# Altium PCB PCBv2.PcbDoc (part 1 of 2)
Units mil, origin at the board's own origin, x right, y up, seen from the top; angles counter-clockwise.
Board outline 6515 x 2205 mil, 4 copper layers (Top Layer, GND, Power, Bottom Layer), stack 30.8 mil thick; 165 components, 130 nets, 555 pads, 55 vias.
Unrouted connection lines stored in the file: 261.
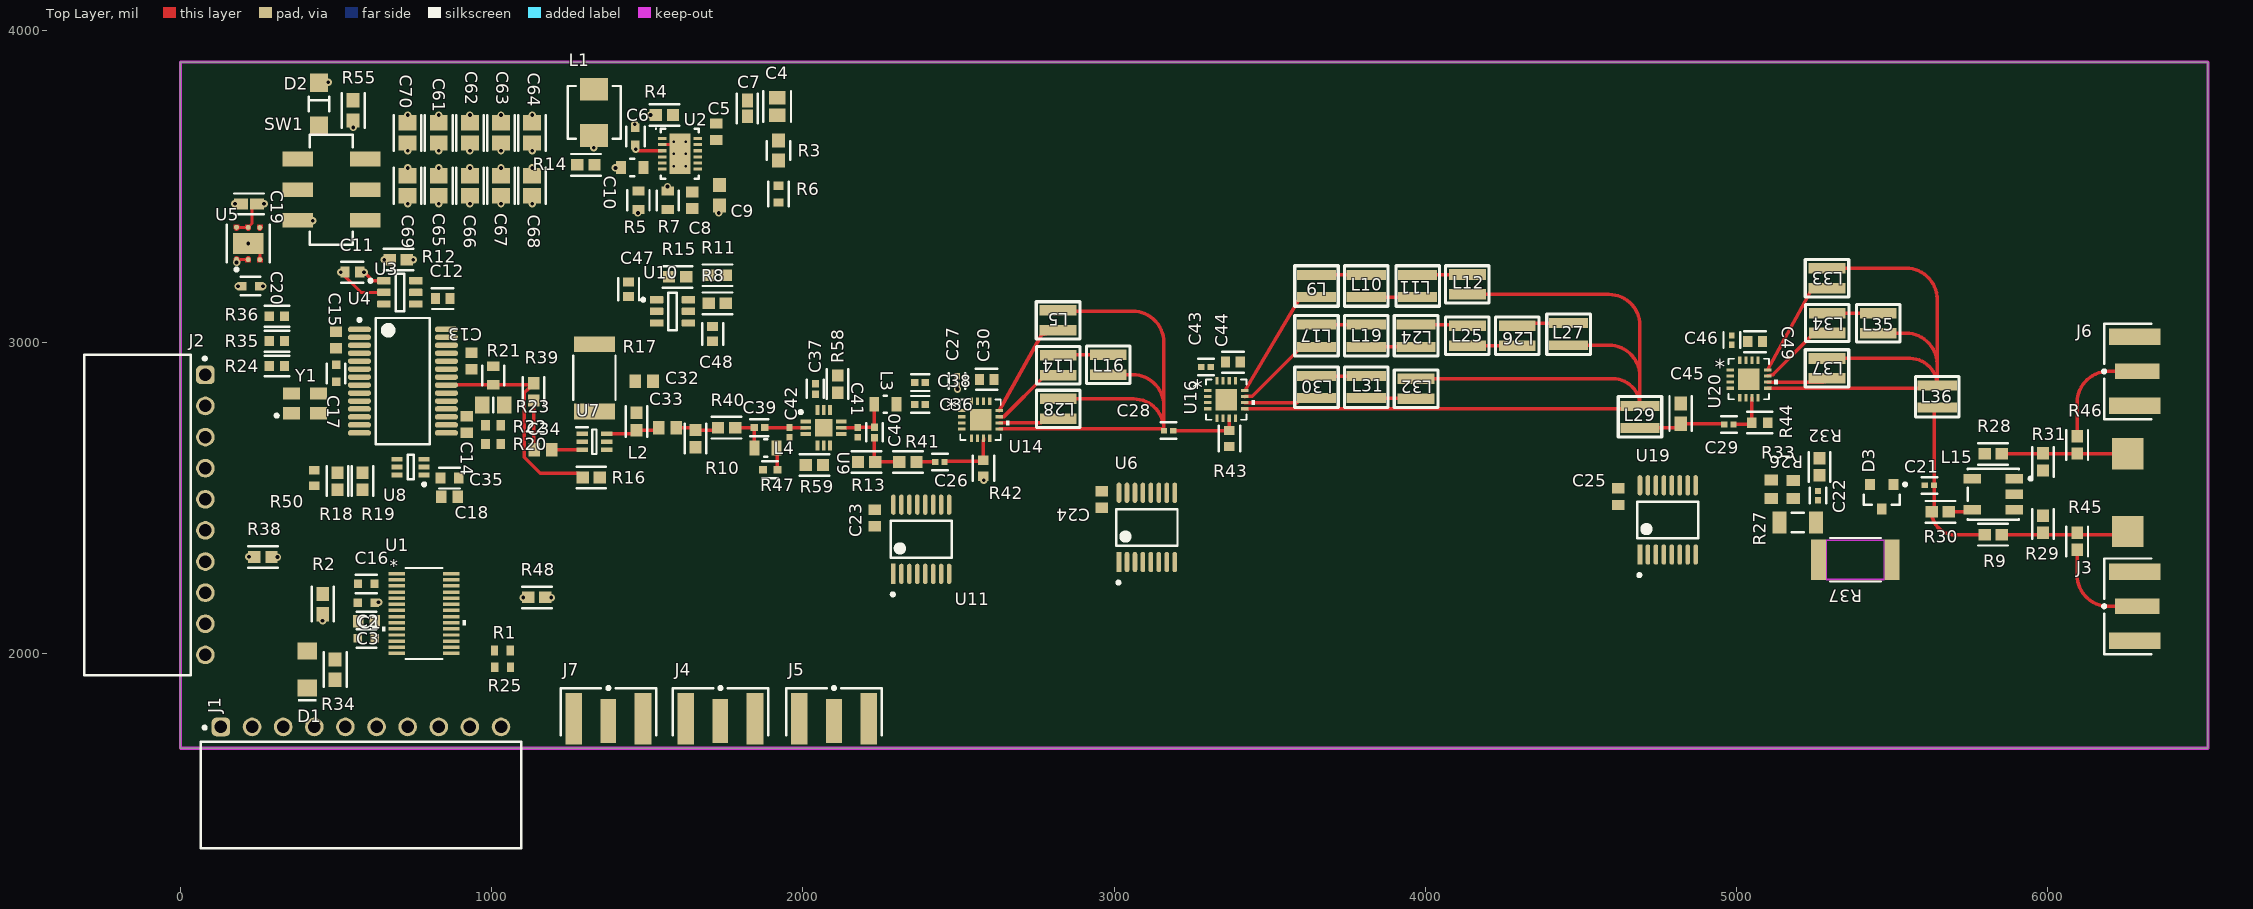
[diagram p0: Top Layer view]
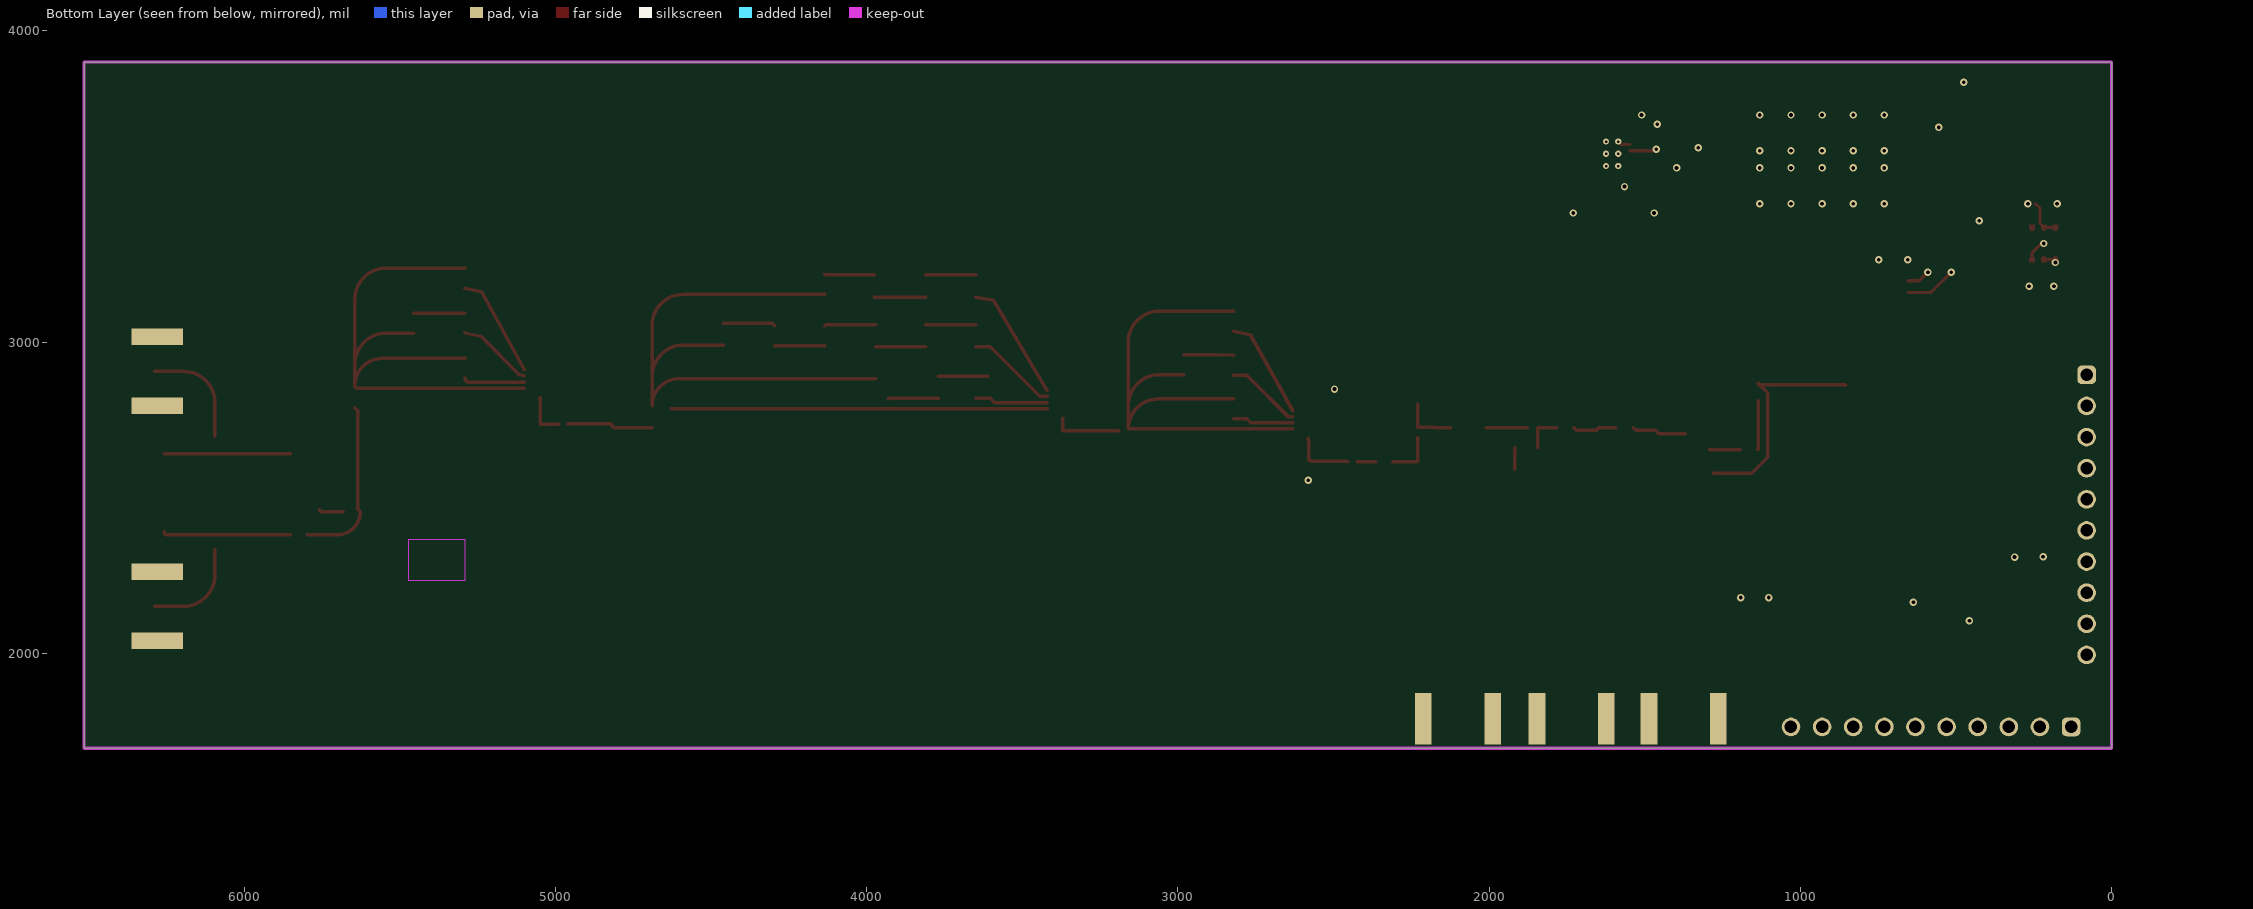
[diagram p1: Bottom Layer view, seen from below]
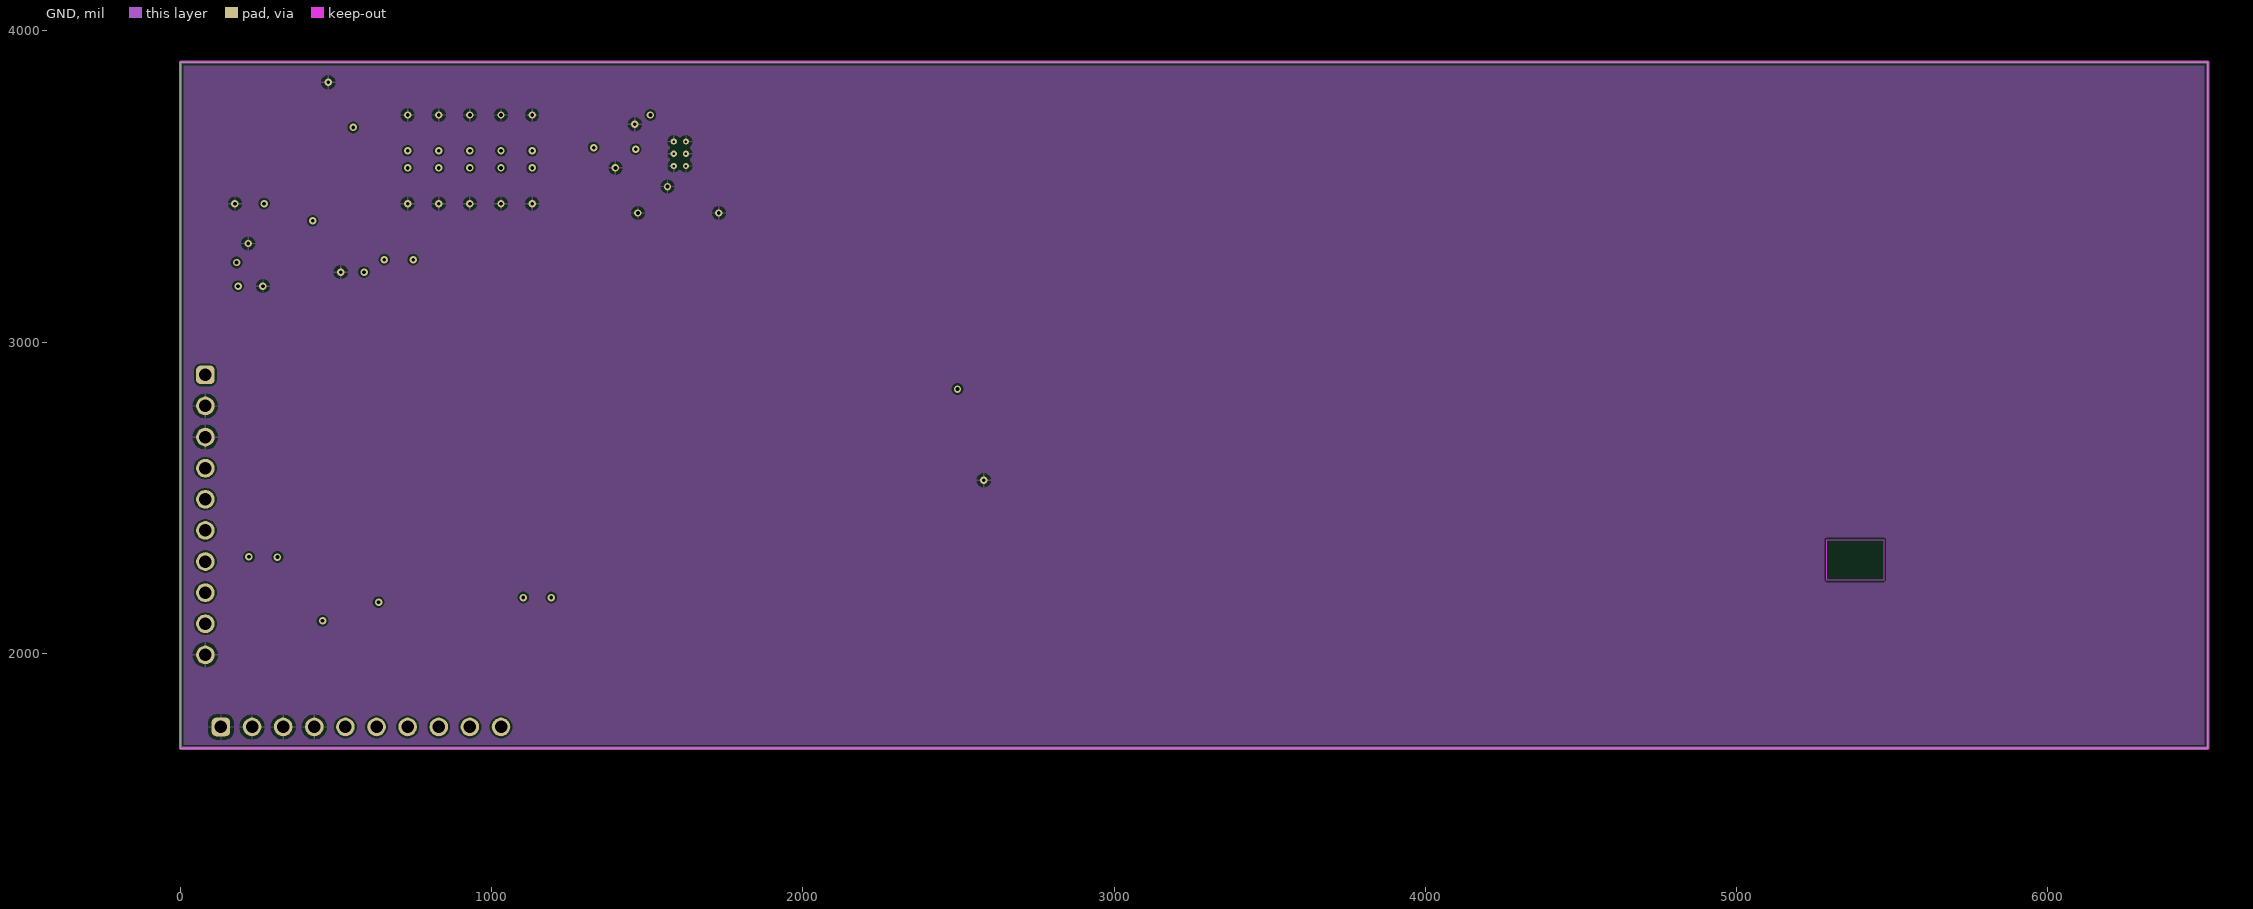
[diagram p2: GND]
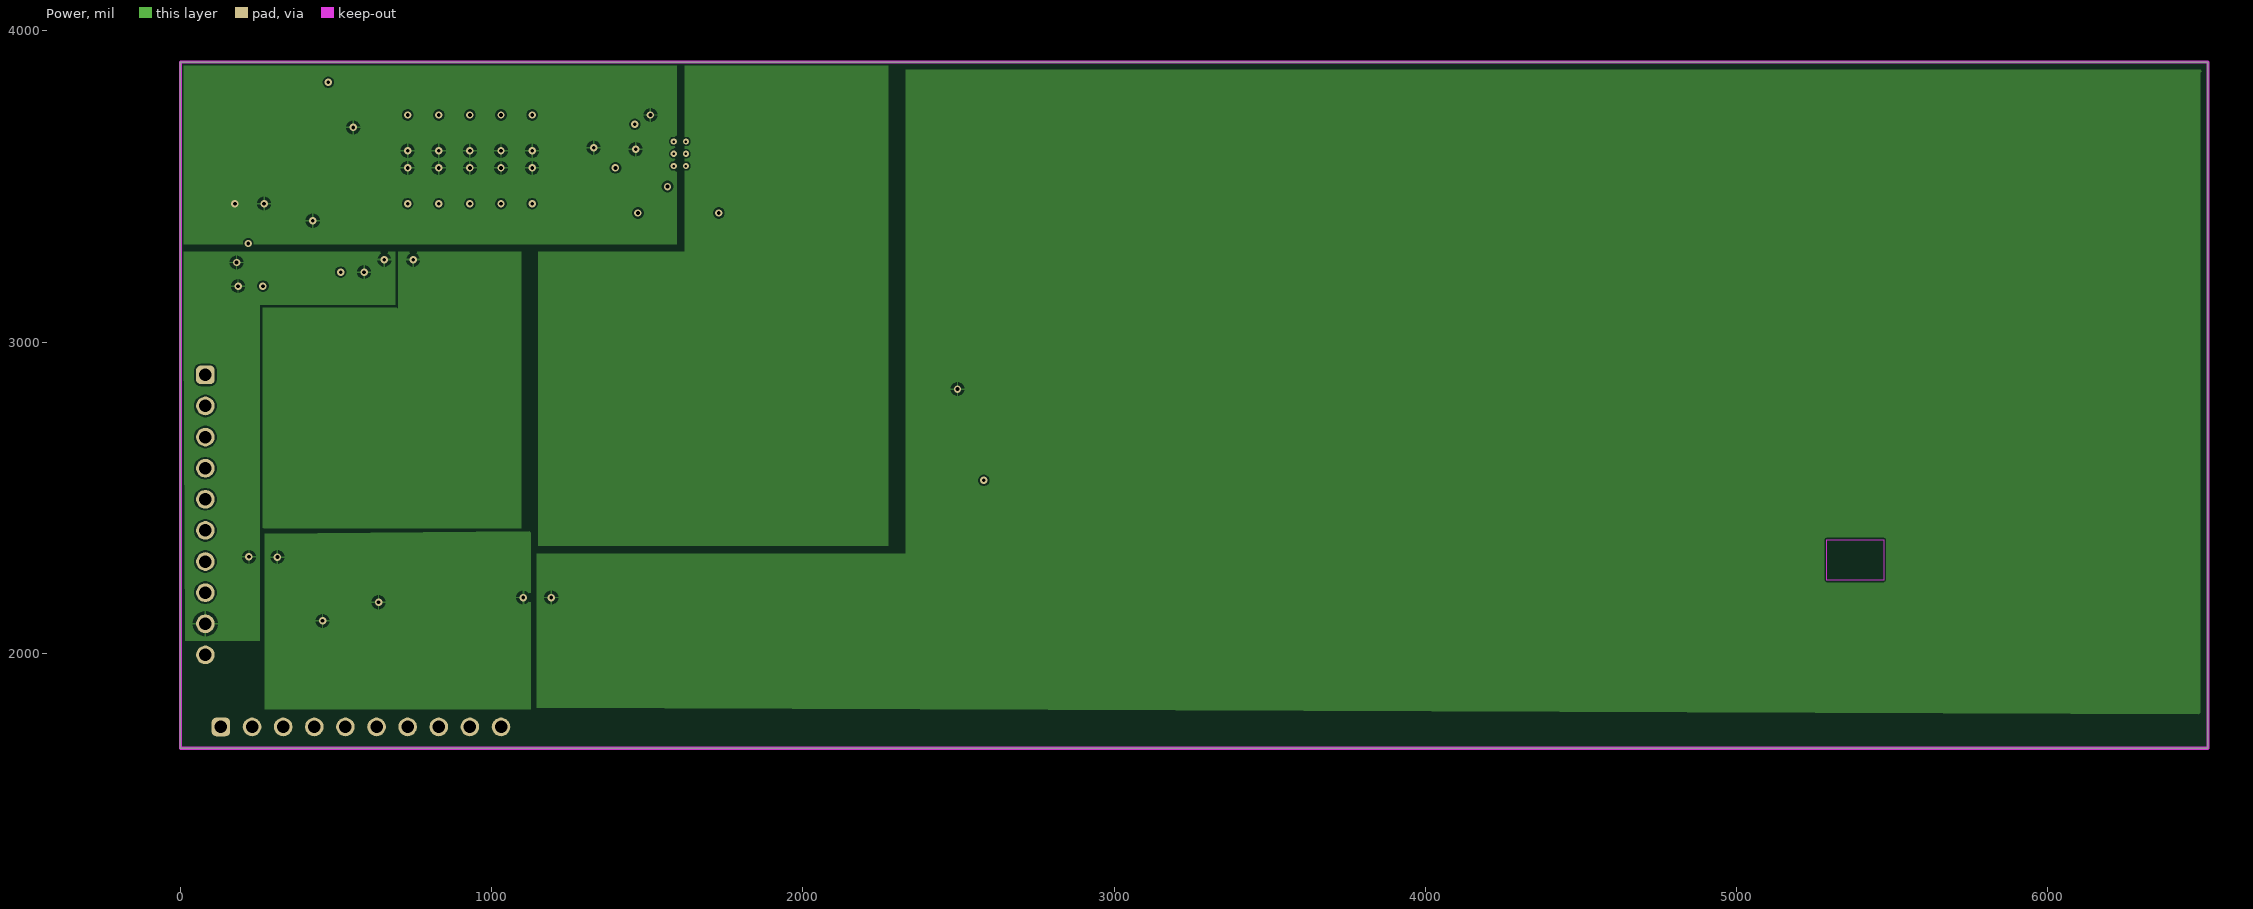
[diagram p3: Power]

## Layer stack, top to bottom
Top Solder: solder mask 0.4, Solder Resist, Dk 3.5
Top Layer: signal copper 1.4
Dielectric 2: prepreg 6.3, PP-006, Dk 4.1
GND: signal copper 1.4
Dielectric 1: dielectric 12.6, FR-4, Dk 4.8
Power: signal copper 1.4
Dielectric 3: prepreg 6.3, PP-006, Dk 4.1
Bottom Layer: signal copper 1.4
Bottom Solder: solder mask 0.4, Solder Resist, Dk 3.5

## Board outline
0,1695 0,3900 6515,3900 6515,1695

## Design rules (kind name [scope] priority, off if disabled: settings)
Clearance [All] p1: gap=6 ignorepadtopadclearanceinfootprint=FALSE except(8: Via-Via; 10: Text-Text)
HoleSize [All] p1: absolutevalues=TRUE maxlimit=100 minlimit=12 maxpercent=80.000 minpercent=20.000
MinimumAnnularRing [All] p1: minimumring=6
MinimumSolderMaskSliver [All] p1 off: minsoldermaskwidth=10
PolygonConnect [All] p1: connectstyle=Relief reliefconductorwidth=6 reliefentries=4 polygonreliefangle="90 Angle" airgapwidth=10
RoomDefinition "U_Match Network" [InComponentClass('U_Match Network')] p1: confinementstyle=ConfineIn formatcopy=TRUE lockcomponents=FALSE outline 1960.43,2110 6090.43,2110 6090.43,3421.1 1960.43,3421.1
RoomDefinition U_Rectifier [InComponentClass('U_Rectifier')] p2: confinementstyle=ConfineIn formatcopy=TRUE lockcomponents=FALSE outline 4945,2800.5 4945,1955 5805,1955 5805,2800.5
RoomDefinition U_Output [InComponentClass('Room Definition1')] p3: confinementstyle=ConfineIn formatcopy=TRUE lockcomponents=FALSE outline 5585.08,1981.22 6760.08,1981.22 6760.08,3085 5585.08,3085
RoomDefinition "U_PA stage 1" [InComponentClass('U_PA stage 1')] p4: confinementstyle=ConfineIn formatcopy=TRUE lockcomponents=FALSE outline 1095,2585 1650,2585 1650,3040 1095,3040
RoomDefinition "U_PA stage 2" [InComponentClass('U_PA stage 2')] p5: confinementstyle=ConfineIn formatcopy=TRUE lockcomponents=FALSE outline 1790,2450 2420,2450 2420,2960 1790,2960
RoomDefinition U_MCU [InComponentClass('U_MCU')] p6: confinementstyle=ConfineIn formatcopy=TRUE lockcomponents=FALSE outline 347.25,1842.98 1142.25,1842.98 1142.25,2337.98 347.25,2337.98
RoomDefinition VBAT [InComponentClass('Room Definition2')] p7: confinementstyle=ConfineIn formatcopy=TRUE lockcomponents=FALSE outline 305,3290 1190,3290 1190,3885 305,3885
RoomDefinition "U_Switch 1" [InComponentClass('U_Switch1')] p8: confinementstyle=ConfineIn formatcopy=TRUE lockcomponents=FALSE outline 890,3355 480,3355 480,3015 890,3015
RoomDefinition U_LDO [InComponentClass('U_LDO')] p9: confinementstyle=ConfineIn formatcopy=TRUE lockcomponents=FALSE outline 130.2,3546.07 130.2,3134.05 375.2,3134.05 375.2,3546.07
RoomDefinition "U_Boost 12V" [InComponentClass('U_Boost 12V')] p10: confinementstyle=ConfineIn formatcopy=TRUE lockcomponents=FALSE outline 1172.6,3245 2002.6,3245 2002.6,3980 1172.6,3980
RoomDefinition "U_Switch 2" [InComponentClass('U_Switch2')] p11: confinementstyle=ConfineIn formatcopy=TRUE lockcomponents=FALSE outline 1325,2955 1810,2955 1810,3290 1325,3290
RoomDefinition U_DDS [InComponentClass('U_DDS')] p12: confinementstyle=ConfineIn formatcopy=TRUE lockcomponents=FALSE outline 75,2340 1085,2340 1085,3205 75,3205
RoutingVias [All] p1: holewidth=12 width=24 viastyle="Through Hole" minholewidth=12 minwidth=24 maxholewidth=28 maxwidth=100
SilkToSilkClearance [All] p1 off: silktosilkclearance=10
SilkToSolderMaskClearance [IsPad] p1 off: minsilkscreentomaskgap=10 clearancetoexposedcopper=TRUE
SolderMaskExpansion [All] p1: expansion=0 istentingtop=FALSE
SupplyNets "Schematic Supply Nets_6" [InNet('3V3MN')] p1: voltage=0.000
SupplyNets "Schematic Supply Nets_8" [InNet('3V3')] p2: voltage=0.000
SupplyNets "Schematic Supply Nets_1" [InNet('3V3MCU')] p3: voltage=0.000
SupplyNets "Schematic Supply Nets_7" [InNet('3V3DDS')] p4: voltage=0.000
SupplyNets "Schematic Supply Nets_5" [InNet('13V0PA')] p5: voltage=0.000
SupplyNets "Schematic Supply Nets_4" [InNet('VBAT')] p6: voltage=0.000
SupplyNets "Schematic Supply Nets_3" [InNet('GND')] p7: voltage=0.000
SupplyNets "Schematic Supply Nets_2" [InNet('13V0')] p8: voltage=0.000
SupplyNets "Schematic Supply Nets" [InNet('PA1_VDD')] p9: voltage=0.000
UnRoutedNet [All] p1: checkbadconnections=TRUE
Width [All] p1: maxlimit=20 minlimit=6 preferedwidth=11.3 minimp=50.000000 maximp=50.000000 favimp=50.000000
25 further rules are at their usual default settings.

## Classes and differential pairs
component class "Room Definition1": J3 J6 L15 R9 R28 R29 R30 R31 R45 R46
component class U_Balun: L15
component class U_Switch2: C47 C48 U10
component class U_Switch1: C11 C12 U3
component class U_Rectifier: C21 C22 D3 R26 R27 R32 R33 R37
component class "U_PA stage 2": C36 C37 C38 C39 C40 C41 C42 L3 L4 R47 R58 R59 U9
component class "U_PA stage 1": C32 C33 C34 L2 R17 U7
component class U_MCU: C1 C2 C3 C16 D1 R1 R2 R25 R34 U1
component class "U_Match Network": C23 C24 C25 C26 C27 C28 C29 C30 C43 C44 C45 C46 C49 C50 C56 L5 L9 L10 L11 L12 L14 L16 L17 L19 L24 L25 L26 L28 L29 L30 L31 L32 L33 L34 L35 L36 L37 R42 R43 R44 U6 U11 U14 U16 U19 U20
component class U_LDO: C19 C20 U5
component class U_DDS: C13 C14 C15 C17 C18 C35 R18 R19 R20 R21 R22 R23 R24 R35 R36 R50 U4 U8 Y1
component class "U_Boost 12V": C4 C5 C6 C7 C8 C9 C10 L1 R3 R4 R5 R6 R7 R14 U2
component class System: C61 C62 C63 C64 C65 C66 C67 C68 C69 C70 D2 J1 J2 J3 J4 J5 J6 J7 R8 R9 R10 R11 R12 R13 R15 R16 R28 R29 R30 R31 R38 R39 R40 R41 R45 R46 R48 R55 SW1

## Components (designator, comment, footprint, x,y, rotation, side; value= is the part's Value field where it differs from the comment)
C1 "C1608X5R1A106K080AC" FP-C1608-080-0_1-MFG 597.25,2162.98 r0 top
C2 "VJ0603Y104KXJAP" CAPC1608X92X38NL15T08 597.25,2102.98 r0 top value=0.1uF
C3 "C1608X5R1A106K080AC" FP-C1608-080-0_1-MFG 597.25,2047.98 r0 top
C4 "CC0805MKX5R8BB226" FP-CC0805-0_2-1_45-IPC_C 1917.6,3757.41 r90 top
C5 "VJ0603Y104KXJAP" CAPC1608X92X38NL15T08 1721.73,3676.07 r270 top value=0.1uF
C6 "C1608X5R1A106K080AC" FP-C1608-080-0_1-MFG 1461.73,3661.07 r270 top
C7 "C1608X5R1H105K080AB" FP-C1608-080-0_1-IPC_B 1821.73,3751.07 r90 top
C8 "C0603C331J5GALTU" CAPC1608X87X35NL15T15 1644.51,3456.5 r90 top value=330pF
C9 "VJ0603A100KXAAC" CAPC1608X92X38ML12T08 1731.77,3472.14 r90 top value=10pF
C10 "C2012X5R1E475K125AB" FP-C2012-125-0_2-MFG 1451.73,3561.07 r180 top
C11 "C0603C106M8PACTU" FP-C0603C106M8PACTU-MFG 552.64,3225 r0 top value=10uF
C12 "C0603C101K4GAC7867" FP-C0603C-CF-MFG 842.64,3140 r180 top value="100 pF"
C13 "VJ0603Y104KXJAP" CAPC1608X92X38NL15T08 935,2940 r270 top value=0.1uF
C14 "VJ0603Y104KXJAP" CAPC1608X92X38NL15T08 920,2735 r90 top value=0.1uF
C15 "VJ0603Y104KXJAP" CAPC1608X92X38NL15T08 500,3006.57 r270 top value=0.1uF
C16 "GRM1885C1H472JA01D" FP-GRM188-0_1-e0_2_0_5-MFG 597.25,2222.98 r180 top
C17 "C1608X5R1A106K080AC" FP-C1608-080-0_1-MFG 500,2900 r90 top
C18 "VJ0603Y104KXJAP" CAPC1608X92X38NL15T08 864.76,2503.27 r180 top value=0.1uF
C19 "C1608X5R1H105K080AB" FP-C1608-080-0_1-IPC_B 220.2,3444.05 r180 top
C20 "C1608X5R1A106K080AC" FP-C1608-080-0_1-MFG 225.14,3180.06 r180 top
C21 "GRM155R62A104KE14D" FP-GRM155-0_05-IPC_C 5620,2540 r180 top
C22 "GCM1555C1H301FA16J" FP-GCM155-0_05-IPC_C 5262,2506.64 r90 top value=300pF
C23 "VJ0603Y104KXJAP" CAPC1608X92X38NL15T08 2230.87,2434.47 r90 top value=0.1uF
C24 "VJ0603Y104KXJAP" CAPC1608X92X38NL15T08 2960.43,2494.76 r90 top value=0.1uF
C25 "VJ0603Y104KXJAP" CAPC1608X92X38NL15T08 4620,2503.43 r90 top value=0.1uF
C26 "GRM155R62A104KE14D" FP-GRM155-0_05-IPC_C 2440,2615 r0 top
C27 "GCM155R71H103KA55D" FP-GCM155-0_05-IPC_C 2495.84,2875.51 r270 top
C28 "GRM155R62A104KE14D" FP-GRM155-0_05-IPC_C 3175.43,2715.51 r0 top
C29 "GRM155R62A104KE14D" FP-GRM155-0_05-IPC_C 4975.43,2735.51 r0 top
C30 "C0603C102K5RACTU" FP-C0603C-CF-MFG 2590.84,2880.51 r180 top value="1,000 pF"
C32 "VJ0603Y183KXAAC" CAPC1608X92X38ML15T08 1490,2875 r0 top
C33 "VJ0603Y183KXAAC" CAPC1608X92X38ML15T08 1565,2725 r0 top value=18nF
C34 "VJ0603Y183KXAAC" CAPC1608X92X38ML15T08 1165,2655 r0 top value=18nF
C35 "CC0603KRX7R9BB103" FP-CC0603-DA-MFG 864.76,2563.27 r0 top value="10 nF"
C36 "GRM155R71H104KE14D" FP-GRM155-0_05-IPC_B 2376.87,2800 r180 top
C37 "GRM155R71H104KE14D" FP-GRM155-0_05-IPC_B 2040,2850 r270 top
C38 "GRM1555C1H102JA01D" FP-GRM155-0_05-IPC_B 2376.87,2870 r180 top
C39 "GRM1555C1H102JA01D" FP-GRM155-0_05-IPC_B 1860,2725 r0 top
C40 "GRM1555C1H102JA01D" FP-GRM155-0_05-IPC_B 2230,2710 r270 top
C41 "GRM1555C1HR40WA01D" CAPC1005X55X25LL05T10 2176.87,2710 r90 top value=0.4pF
C42 "GRM1555C1HR40WA01D" CAPC1005X55X25LL05T10 1956.87,2710 r90 top value=0.4pF
C43 "GCM155R71H103KA55D" FP-GCM155-0_05-IPC_C 3295.43,2920.51 r0 top
C44 "C0603C102K5RACTU" FP-C0603C-CF-MFG 3381.81,2935.51 r180 top value="1,000 pF"
C45 "GCM1885C2A300JA16D" FP-GCM188-0_1-IPC_A 4820.43,2770.51 r270 top
C46 "GCM155R71H103KA55D" FP-GCM155-0_05-IPC_C 4984.93,3006.51 r270 top
C47 "C0603C106M8PACTU" FP-C0603C106M8PACTU-MFG 1440,3170 r270 top value=10uF
C48 "C0603C101K4GAC7867" FP-C0603C-CF-MFG 1710,3026.38 r90 top value="100 pF"
C49 "C0603C102K5RACTU" FP-C0603C-CF-MFG 5059.93,3001.51 r180 top value="1,000 pF"
C61 "GRM21BR60J107ME15K" FP-GRM21B-0_2-e0_2_0_7-IPC_B 830,3672.51 r90 top
C62 "GRM21BR60J107ME15K" FP-GRM21B-0_2-e0_2_0_7-IPC_B 930,3672.51 r90 top
C63 "GRM21BR60J107ME15K" FP-GRM21B-0_2-e0_2_0_7-IPC_B 1030,3672.51 r90 top
C64 "GRM21BR60J107ME15K" FP-GRM21B-0_2-e0_2_0_7-IPC_B 1130,3672.51 r90 top
C65 "GRM21BR60J107ME15K" FP-GRM21B-0_2-e0_2_0_7-IPC_B 830,3502.51 r270 top
C66 "GRM21BR60J107ME15K" FP-GRM21B-0_2-e0_2_0_7-IPC_B 930,3502.51 r270 top
C67 "GRM21BR60J107ME15K" FP-GRM21B-0_2-e0_2_0_7-IPC_B 1030,3502.51 r270 top
C68 "GRM21BR60J107ME15K" FP-GRM21B-0_2-e0_2_0_7-IPC_B 1130,3502.51 r270 top
C69 "GRM21BR60J107ME15K" FP-GRM21B-0_2-e0_2_0_7-IPC_B 730,3502.51 r270 top
C70 "GRM21BR60J107ME15K" FP-GRM21B-0_2-e0_2_0_7-IPC_B 730,3672.51 r90 top
D1 "150120SS75000" WL-SMCW_1206_150120xx75000 407.25,1947.98 r90 top
D2 "HSMG-C150" FP-HSMG-C150-MFG 445,3765 r270 top
D3 "BAS16LT1G" ONSC-SOT-23-3-318-08_V 5467,2503.57 r270 top
J1 "613010143121" 613010143121 580,1545 r0 top
J2 "613010143121" 613010143121 -138.51,2445 r270 top
J3 "SMA-J-P-H-ST-EM1" FP-SMA-J-P-H-ST-EM1-MFG 6550.08,2151.22 r90 top
J4 "SMA-J-P-H-ST-EM1" FP-SMA-J-P-H-ST-EM1-MFG 1735,1520 r0 top
J5 "SMA-J-P-H-ST-EM1" FP-SMA-J-P-H-ST-EM1-MFG 2100,1520 r0 top
J6 "SMA-J-P-H-ST-EM1" FP-SMA-J-P-H-ST-EM1-MFG 6550.08,2906.22 r90 top
J7 "SMA-J-P-H-ST-EM1" FP-SMA-J-P-H-ST-EM1-MFG 1375,1520 r0 top
L1 "IHLP1616BZER4R7M11" FP-IHLP-1616BZ-FP_1_8545x-MFG 1329.41,3738.26 r90 top
L2 "LQM18NNR82K00D" FP-LQM18NN_00-IPC_B 1465,2745 r90 top
L3 "0805LS-152XJEC" FP-LQW21HN_00-MFG 2265,2800 r0 top
L4 "LQW21HN1R5J00L" FP-LQW21HN_00-MFG 1880,2660 r180 top
L5 "XGL3014-331MEC" 3014 2820,3070 r90 top value=330nH
L9 "XGL3512-122MEC" 3512 3650.43,3180.51 r90 top value=1.2uH
L10 "XGL3512-122MEC" 3512 3810.43,3180.51 r270 top value=1.2uH
L11 "XGL3512-621MEC" 3512 3975.43,3180.51 r90 top value=620nH
L12 "XGL3020-561MEC" 3020 4135.43,3185.51 r270 top value=560nH
L14 "XGL3020-681MEC" 3020 2820.93,2925.6 r90 top value=680nH
L15 "MABAES0060" FP-MABAES0060-MFG 5825.08,2511.22 r0 top
L16 "XGL3014-331MEC" 3014 2980.93,2927.6 r270 top value=330nH
L17 "XGL3512-122MEC" 3512 3650.43,3020.51 r90 top value=1.2uH
L19 "XGL3512-122MEC" 3512 3810.43,3020.51 r270 top value=1.2uH
L24 "XGL3512-122MEC" 3512 3970.43,3020.51 r90 top value=1.2uH
L25 "XGL3020-561MEC" 3020 4135.43,3020.51 r270 top value=560nH
L26 "XGL3020-561MEC" 3020 4295.43,3020.51 r90 top value=560nH
L27 "XGL3512-621MEC" 3512 4460.43,3025.51 r270 top value=620nH
L28 "XGL3020-681MEC" 3020 2820.93,2785.6 r90 top value=680nH
L29 "XGL3512-621MEC" 3512 4690,2760 r270 top value=620nH
L30 "XGL3512-621MEC" 3512 3650.43,2855.51 r90 top value=620nH
L31 "XGL3512-621MEC" 3512 3810.43,2855.51 r270 top value=620nH
L32 "XGL3020-561MEC" 3020 3970.43,2850.51 r90 top value=560nH
L33 "XGL3014-201MEC" 3014 5290.93,3205.6 r90 top value=200nH
L34 "XGL3014-201MEC" 3014 5291.93,3061.51 r90 top value=200nH
L35 "XGL3020-681MEC" 3020 5455.93,3060.6 r270 top value=680nH
L36 "XGL3512-621MEC" 3512 5645,2825 r270 top value=620nH
L37 "XGL3020-681MEC" 3020 5290.93,2915.6 r90 top value=680nH
R1 "RC0603FR-074K7L" RESC1608X55X25LL10T15 1034.59,2008.96 r0 top
R2 "ESR03EZPF3301" FP-ESR03-IPC_A 457.25,2157.98 r270 top
R3 "RN73H1JTTD1113D25" FP-CRCW0603-e3-IPC_A 1921.73,3616.07 r90 top
R4 "RMCF0603ZG0R00" FP-RMCF0603-IPC_B 1555,3730 r0 top
R5 "CRCW060357K6FKEA" FP-CRCW0603-e3-MFG 1471.73,3456.07 r90 top
R6 "AC0603FR-1311K3L" FP-AC0603-IPC_C 1921.73,3476.07 r90 top value=11.3KΩ
R7 "CRCW060386K6FKEAHP" FP-CRCW0603-HPe3-MFG 1565.61,3455.79 r270 top
R8 "RMCF0603ZG0R00" FP-RMCF0603-IPC_B 1725,3125 r180 top
R9 "RMCF0603ZG0R00" FP-RMCF0603-IPC_B 5825.08,2381.22 r0 top
R10 "RMCF0603ZG0R00" FP-RMCF0603-IPC_B 1655,2690 r90 top
R11 "DNF" FP-RMCF0603-IPC_B 1725,3215 r0 top
R12 "DNF" FP-RMCF0603-IPC_B 700,3265 r180 top
R13 "RMCF0603ZG0R00" FP-RMCF0603-IPC_B 2205,2615 r0 top
R14 "RMCF0603ZG0R00" FP-RMCF0603-IPC_B 1302.6,3570 r0 top
R15 "RMCF0603ZG0R00" FP-RMCF0603-IPC_B 1597.4,3210 r0 top
R16 "RMCF0603ZG0R00" FP-RMCF0603-IPC_B 1320,2565 r180 top
R17 "RMCF2512JT200R" FP-RMCF2512-IPC_C 1330,2885 r90 top
R18 "DNF" FP-RMCF0603-IPC_B 504.76,2553.27 r90 top
R19 "DNF" FP-RMCF0603-IPC_B 584.76,2553.27 r90 top
R20 "DNF" RESC1608X55X30LL15T15 1004.76,2672.87 r0 top
R21 "DNF" FP-CRCW0603-e3-MFG 1004.76,2892.87 r90 top
R22 "DNF" RESC1608X55X30LL15T15 1004.76,2732.87 r0 top
R23 "DNF" 6-0805_N 1004.76,2797.87 r0 top value=25
R24 "CRGCQ0603J10K" FP-CRGCQ0603-IPC_C 309.76,2923.27 r0 top value=10KΩ
R25 "RC0603FR-074K7L" RESC1608X55X25LL10T15 1035.05,1955.65 r0 top
R26 "RK73H1JTTD3003F" RESC1608X55X30ML20T10 5182,2526.64 r270 top value=300K
R27 "SG73P2BTTD2002F" RESC3216X70X40NL20T20 5197,2420.5 r180 top value=20K
R28 "RMCF0603ZG0R00" FP-RMCF0603-IPC_B 5825.08,2641.22 r0 top
R29 "DNF" FP-RMCF0603-IPC_B 5985,2415 r270 top
R30 "DNF" FP-RMCF0603-IPC_B 5655,2455 r0 top
R31 "DNF" FP-RMCF0603-IPC_B 5985,2615 r270 top
R32 "RMCF0603ZG0R00" FP-RMCF0603-IPC_B 5267,2599.51 r270 top
R33 "RK73H1JTTD1003F" RESC1608X55X30ML20T10 5112,2527.11 r90 top value=100K
R34 "CRCW0603220RFKEAHP" FP-CRCW0603-HPe3-IPC_A 497.25,1947.98 r270 top
R35 "CRGCQ0603J10K" FP-CRGCQ0603-IPC_C 309.76,3003.27 r0 top value=10KΩ
R36 "CRGCQ0603J10K" FP-CRGCQ0603-IPC_C 309.76,3083.27 r0 top value=10KΩ
R37 "CRM2512-JW-103ELF" BO_CR2512 5382,2300.5 r180 top value=10K
R38 "DNF" FP-RMCF0603-IPC_B 265,2310 r180 top
R39 "DNF" FP-RMCF0603-IPC_B 1135,2840 r90 top
R40 "DNF" FP-RMCF0603-IPC_B 1755,2725 r180 top
R41 "DNF" FP-RMCF0603-IPC_B 2337.4,2615 r180 top
R42 "ERJ-3EKF1004V" FP-ERJ3EK-IPC_C 2580,2595 r90 top
R43 "ERJ-3EKF1004V" FP-ERJ3EK-IPC_C 3370.43,2690.51 r90 top
R44 "ERJ-3EKF1004V" FP-ERJ3EK-IPC_C 5074.93,2741.51 r180 top
R45 "RMCF0603ZG0R00" FP-RMCF0603-IPC_B 6095,2360 r90 top
R46 "RMCF0603ZG0R00" FP-RMCF0603-IPC_B 6095,2670 r270 top
R47 "FCHP0402E50R0BBT1" FP-FC0402-MFG 1895,2590 r0 top
R48 "DNF" FP-RMCF0603-IPC_B 1145,2180 r0 top
R50 "ERJ-3EKF1001V" RESC1608X55X30LL15T15 429.76,2563.27 r90 top
R55 "CRCW0603220RFKEAHP" FP-CRCW0603-HPe3-IPC_A 555,3745 r270 top
R58 "RMCF0603ZG0R00" FP-RMCF0603-IPC_B 2111.87,2865 r270 top
R59 "RMCF0603ZG0R00" FP-RMCF0603-IPC_B 2036.87,2605 r0 top
SW1 "452406020024" 452406020024 485,3490 r90 top
U1 "XMSM0L1105TDGS28R" VSSOP28_DGS_TEX 782.25,2127.98 r0 top
U2 "LTC3122EDE#PBF" LT-DE-UE-12_V 1604.65,3605.28 r0 top
U3 "TPS22810TDBVRQ1" FP-DBV0006A-MFG 705,3160 r0 top
U4 "AD9850BRSZ-REEL" ADI-RS-28_N 714.76,2874.84 r0 top
U5 "LD39200PU33R" FP-DFN6-7946637-MFG 217.6,3317.03 r90 top
U6 "CD74HC238PWR" FP-PW0016A-IPC_B 3105.43,2404.66 r90 top
U7 "TQP369184" SOT65P210X110-6N 1330,2680 r0 top
U8 "TPL0401A-10DCKR" TI-DCK6_V 739.76,2598.27 r180 top
U9 "PMA3-43-1W+" QFN51P300X300X89-13N 2066.87,2725 r0 top
U10 "TPS22810TDBVRQ1" FP-DBV0006A-MFG 1581.18,3098.98 r0 top
U11 "CD74HC238PWR" FP-PW0016A-IPC_B 2380.43,2366.66 r90 top
U14 "TS63410K" QFN16_3x3x0p8_TGT 2570.91,2750.51 r0 top
U16 "TS63410K" QFN16_3x3x0p8_TGT 3360.43,2815.51 r0 top
U19 "CD74HC238PWR" FP-PW0016A-IPC_B 4779.43,2428.76 r90 top
U20 "TS63410K" QFN16_3x3x0p8_TGT 5039.93,2881.51 r0 top
Y1 "830207044109" WE-SPXO_CFPS-39 399.76,2803.27 r0 top

## Footprints (in the part's own frame and the unit in brackets; to place one, negate y for a bottom-side part, rotate by r counter-clockwise, add the part's x,y. Pads: shape width x height; smd on the part's side, far side on the other; paste and mask are expansions set on the pad)
6-0805_N [mm] "Chip Resistor, Body 2.0x1.2mm, IPC Medium Density"
  rect 1.2x1.4 smd: 1(-0.9,0) 2(0.9,0)
  silkscreen extent 0,-0.6 0,0.6, body extent -1.07,-0.7 1.07,0.7, height 0.7
3014 [mil]
  rect 34x118 smd: 1(-32,0) 2(32,0)
  silkscreen extent -60,-70 60,70
3020 [mil]
  rect 34x118 smd: 1(-32,0) 2(32,0)
  silkscreen extent -60,-70 60,70
3512 [mil]
  rect 32x126 smd: 1(-35.5,0) 2(35.5,0)
  silkscreen extent -65,-70 65,70
452406020024 [mm] "SMT Mini Slide Switch, Same Side Connection, body 9.00 x 3.50 mm"
  rect 1.2x2.5 smd: 1(2.5,2.75) 2(0,2.75) 3(-2.5,2.75) 4(2.5,-2.75) 5(0,-2.75) 6(-2.5,-2.75)
  silkscreen extent -4.5,-1.75 4.5,1.75, body extent -4.52,-3.75 4.52,3.75, height 5.5
613010143121 [mm] "Socket Header, Pitch 2.54 mm, THT, Angled, single row, 10p"
  rrect50% 1.52x1.52 hole 1.02: 1(-11.43,5.55)
  round 1.52 hole 1.02: 2(-8.89,5.55) 3(-6.35,5.55) 4(-3.81,5.55) 5(-1.27,5.55) 6(1.27,5.55) 7(3.81,5.55) 8(6.35,5.55) 9(8.89,5.55) 10(11.43,5.55)
  silkscreen extent -13.08,-4.35 13.08,5.62, body extent -12.95,-4.25 12.95,5.75, height 2.55
ADI-RS-28_N [mm] "SOP, 28-Leads, Body 10.2x5.3mm, Pitch 0.65mm, IPC Medium Density"
  oval 1.9x0.45 smd: 1(-3.55,4.225) 2(-3.55,3.575) 3(-3.55,2.925) 4(-3.55,2.275) 5(-3.55,1.625) 6(-3.55,0.975) 7(-3.55,0.325) 8(-3.55,-0.325) 9(-3.55,-0.975) 10(-3.55,-1.625) 11(-3.55,-2.275) 12(-3.55,-2.925) 13(-3.55,-3.575) 14(-3.55,-4.225) 15(3.55,-4.225) 16(3.55,-3.575) 17(3.55,-2.925) 18(3.55,-2.275) 19(3.55,-1.625) 20(3.55,-0.975) 21(3.55,-0.325) 22(3.55,0.325) 23(3.55,0.975) 24(3.55,1.625) 25(3.55,2.275) 26(3.55,2.925) 27(3.55,3.575) 28(3.55,4.225)
  silkscreen extent -3.67,-5.15 2.2,5.15, body extent -2.69,-5.17 2.69,5.17, height 1.98
BO_CR2512 [mil]
  rect 48x130 smd paste+0 mask+0: 1(-118,0) 2(118,0)
  Top Layer keep-out region: -92,-63 -92,63 92,63 92,-63
  Keep-Out Layer region: -92,-65 -92,65 92,65 92,-65
  silkscreen extent -82,-70 82,70, body extent -128,-65 128,65, height 30
CAPC1005X55X25LL05T10 [mm] "Chip Capacitor, 2-Leads, Body 1.00x0.50mm, IPC High Density"
  rect 0.56x0.52 smd: 1(-0.39,0) 2(0.39,0)
  body extent -0.53,-0.28 0.53,0.28, height 0.55
CAPC1608X87X35NL15T15 [mm] "Chip Capacitor, 2-Leads, Body 1.60x0.80mm, IPC Medium Density"
  rect 0.9x1 smd: 1(-0.675,0) 2(0.675,0)
  body extent -0.87,-0.48 0.87,0.47, height 0.87
CAPC1608X92X38ML12T08 [mm] "Chip Capacitor, 2-Leads, Body 1.60x0.80mm, IPC Low Density"
  rect 1.15x1.05 smd: 1(-0.85,0) 2(0.85,0)
  body extent -0.86,-0.46 0.86,0.46, height 0.92
CAPC1608X92X38ML15T08 [mm] "Chip Capacitor, 2-Leads, Body 1.60x0.80mm, IPC Low Density"
  rect 0.95x1.1 smd: 1(-0.725,0) 2(0.725,0)
  body extent -0.87,-0.48 0.87,0.47, height 0.92
CAPC1608X92X38NL15T08 [mm] "Chip Capacitor, 2-Leads, Body 1.60x0.80mm, IPC Medium Density"
  rect 0.85x1 smd: 1(-0.675,0) 2(0.675,0)
  body extent -0.87,-0.48 0.87,0.47, height 0.92
FP-AC0603-IPC_C [mil]
  rect 25.93x31.97 smd paste+0 mask+0: 1(-26.64,0) 2(26.64,0)
  silkscreen extent -40,-33 40,33, body extent -44,-22 44,22, height 10
FP-C0603C106M8PACTU-MFG [mm]
  rect 0.75x0.9 smd paste+0 mask+0: 1(-0.6,0) 2(0.6,0)
  silkscreen extent -0.9,-0.85 0.9,0.85, body extent -1.2,-0.6 1.2,0.6, height 0.25
FP-C0603C-CF-MFG [mm]
  rect 0.75x0.9 smd paste+0 mask+0: 1(-0.6,0) 2(0.6,0)
  silkscreen extent -0.87,-0.85 0.88,0.85, body extent -1.2,-0.6 1.2,0.6, height 0.25
FP-C1608-080-0_1-IPC_B [mil]
  rect 44.53x35.91 smd paste+0 mask+0: 1(-25.22,0) 2(25.22,0)
  silkscreen extent -47,-34 47,34, body extent -57,-28 57,28, height 10
FP-C1608-080-0_1-MFG [mm]
  rect 0.7x0.7 smd paste+0 mask+0: 1(-0.7,0) 2(0.7,0)
  silkscreen extent -0.8,-0.75 0.8,0.75, body extent -0.8,-0.4 0.8,0.4, height 0.9
FP-C2012-125-0_2-MFG [mm]
  rect 0.8x1.05 smd paste+0 mask+0: 1(-0.925,0) 2(0.925,0)
  silkscreen extent -0.15,-0.72 0.15,0.72, body extent -1.43,-0.82 1.43,0.82, height 0.25
FP-CC0603-DA-MFG [mm]
  rect 0.8x0.9 smd paste+0 mask+0: 1(-0.75,0) 2(0.75,0)
  silkscreen extent -0.85,-0.85 0.85,0.85, body extent -1.35,-0.75 1.35,0.75, height 0.25
FP-CC0805-0_2-1_45-IPC_C [mil]
  rect 43.49x53.39 smd paste+0 mask+0: 1(-27.59,0) 2(27.59,0)
  silkscreen extent -49,-44 49,44, body extent -53,-32 53,32, height 10
FP-CRCW0603-e3-IPC_A [mil]
  rect 44.69x41.82 smd paste+0 mask+0: 1(-32.1,0) 2(32.1,0)
  silkscreen extent -30,-37 30,37, body extent -74,-41 74,41, height 10
FP-CRCW0603-e3-MFG [mm]
  rect 0.75x1 smd paste+0 mask+0: 1(-0.75,0) 2(0.75,0)
  silkscreen extent -0.8,-0.9 0.8,0.9, body extent -1.22,-0.6 1.22,0.6, height 0.25
FP-CRCW0603-HPe3-IPC_A [mil]
  rect 45.6x41.82 smd paste+0 mask+0: 1(-32.56,0) 2(32.56,0)
  silkscreen extent -55,-37 55,37, body extent -75,-41 75,41, height 10
FP-CRCW0603-HPe3-MFG [mm]
  rect 0.75x1 smd paste+0 mask+0: 1(-0.75,0) 2(0.75,0)
  silkscreen extent -0.8,-0.9 0.8,0.9, body extent -1.22,-0.6 1.22,0.6, height 0.25
FP-CRGCQ0603-IPC_C [mil]
  rect 29.85x31.97 smd paste+0 mask+0: 1(-24.69,0) 2(24.68,0)
  silkscreen extent -40,-33 40,33, body extent -44,-22 44,22, height 10
FP-DBV0006A-MFG [mm]
  rrect17% 1.1x0.6 smd paste+0 mask+0: 1(-1.3,0.95) 2(-1.3,0) 3(-1.3,-0.95) 4(1.3,-0.95) 5(1.3,0) 6(1.3,0.95)
  silkscreen extent -2.52,-1.53 0.35,1.53, body extent -1.95,-1.78 1.95,1.78, height 0.25
FP-DFN6-7946637-MFG [mm]
  round 0.405 smd paste+0 mask+0: 1(-1.3,0.95) 2(-1.321,0) 3(-1.321,-0.95) 4(1.3,-0.95) 5(1.321,0) 6(1.321,0.95)
  rect 1.75x2.5 smd paste+0 mask+0: 7(0,0)
  Top Layer region: -1.55,-0.725 -1.275,-0.725 -1.189,-0.742 -1.116,-0.791 -1.067,-0.864 -1.05,-0.95 -1.05,-0.95 -1.067,-1.036 -1.116,-1.109 -1.189,-1.158 -1.275,-1.175 -1.275,-1.175 -1.55,-1.175
  Top Layer region: 1.55,-1.175 1.275,-1.175 1.189,-1.158 1.116,-1.109 1.067,-1.036 1.05,-0.95 1.05,-0.95 1.067,-0.864 1.116,-0.791 1.189,-0.742 1.275,-0.725 1.275,-0.725 1.55,-0.725
  Top Layer region: 1.55,0.725 1.275,0.725 1.189,0.742 1.116,0.791 1.067,0.864 1.05,0.95 1.05,0.95 1.067,1.036 1.116,1.109 1.189,1.158 1.275,1.175 1.275,1.175 1.55,1.175
  Top Layer region: 1.55,-0.225 1.275,-0.225 1.189,-0.208 1.116,-0.159 1.067,-0.086 1.05,0 1.05,0 1.067,0.086 1.116,0.159 1.189,0.208 1.275,0.225 1.275,0.225 1.55,0.225
  Top Layer region: -1.55,1.175 -1.275,1.175 -1.189,1.158 -1.116,1.109 -1.067,1.036 -1.05,0.95 -1.05,0.95 -1.067,0.864 -1.116,0.791 -1.189,0.742 -1.275,0.725 -1.275,0.725 -1.55,0.725
  Top Layer region: -1.55,0.225 -1.275,0.225 -1.189,0.208 -1.116,0.159 -1.067,0.086 -1.05,0 -1.05,0 -1.067,-0.086 -1.116,-0.159 -1.189,-0.208 -1.275,-0.225 -1.275,-0.225 -1.55,-0.225
  silkscreen extent -2.25,-1.75 1.55,1.75, body extent -1.65,-1.65 1.65,1.65, height 0.25
FP-ERJ3EK-IPC_C [mil]
  rect 29.78x33.94 smd paste+0 mask+0: 1(-25.62,0) 2(25.62,0)
  silkscreen extent -41,-34 41,34, body extent -44,-23 44,23, height 10
FP-ESR03-IPC_A [mil]
  rect 45.6x39.85 smd paste+0 mask+0: 1(-32.56,0) 2(32.56,0)
  silkscreen extent -55,-36 55,36, body extent -75,-40 75,40, height 10
FP-FC0402-MFG [mm]
  rect 0.635x0.61 smd paste+0 mask+0: 1(-0.597,0) 2(0.597,0)
  silkscreen extent -0.64,-0.7 0.64,0.7, body extent -1.01,-0.44 1.01,0.44, height 0.25
FP-GCM155-0_05-IPC_C [mil]
  rect 20.29x18.6 smd paste+0 mask+0: 1(-14.9,0) 2(14.9,0)
  silkscreen extent -25,-27 25,27, body extent -29,-15 29,15, height 10
FP-GCM188-0_1-IPC_A [mil]
  rect 45.62x39.85 smd paste+0 mask+0: 1(-32.55,0) 2(32.55,0)
  silkscreen extent -55,-36 55,36, body extent -75,-40 75,40, height 10
FP-GRM21B-0_2-e0_2_0_7-IPC_B [mil]
  rect 49.4x57.33 smd paste+0 mask+0: 1(-32.51,0) 2(32.51,0)
  silkscreen extent -57,-44 57,44, body extent -67,-39 67,39, height 10
FP-GRM155-0_05-IPC_B [mil]
  rect 24.23x22.54 smd paste+0 mask+0: 1(-16.87,0) 2(16.87,0)
  silkscreen extent -29,-27 29,27, body extent -35,-17 35,17, height 10
FP-GRM155-0_05-IPC_C [mil]
  rect 20.29x18.6 smd paste+0 mask+0: 1(-14.9,0) 2(14.9,0)
  silkscreen extent -25,-27 25,27, body extent -29,-15 29,15, height 10
FP-GRM188-0_1-e0_2_0_5-MFG [mm]
  rect 0.65x0.7 smd paste+0 mask+0: 1(-0.675,0) 2(0.675,0)
  silkscreen extent -0.85,-0.75 0.85,0.75, body extent -0.8,-0.4 0.8,0.4, height 0.9
FP-HSMG-C150-MFG [mm]
  rect 1.5x1.5 smd paste+0 mask+0: 1(-1.75,0) 2(1.75,0)
  silkscreen extent -0.6,-0.85 0.6,0.85, body extent -2.6,-0.95 2.6,0.95, height 0.25
FP-IHLP-1616BZ-FP_1_8545x-MFG [mil]
  rect 73.01x90 smd paste+0 mask+0: 1(-74.5,0) 2(74.5,0)
  silkscreen extent -85,-85 85,85, body extent -115,-89 115,89, height 10
FP-LQM18NN_00-IPC_B [mil]
  rect 39.63x37.73 smd paste+0 mask+0: 1(-28.58,0) 2(28.58,0)
  silkscreen extent -48,-35 48,35, body extent -58,-29 58,29, height 10
FP-LQW21HN_00-MFG [mm]
  rect 0.8x1.2 smd paste+0 mask+0: 1(-0.9,0) 2(0.9,0)
  silkscreen extent -0.12,-0.7 0.13,0.7, body extent -1.4,-0.8 1.4,0.8, height 0.25
FP-MABAES0060-MFG [mm]
  rect 1.4x0.76 smd paste+0 mask+0: 1(1.715,1.27) 2(1.715,0) 3(1.715,-1.27) 4(-1.715,-1.27) 5(-1.715,1.27)
  silkscreen extent -2.09,-2.09 3.18,2.09, body extent -2.51,-2.19 2.51,2.19, height 0.25
FP-PW0016A-IPC_B [mm]
  rect 1.655x0.381 smd paste+0 mask+0: 1(-2.825,2.275)
  rrect100% 1.655x0.381 smd paste+0 mask+0: 2(-2.825,1.625) 3(-2.825,0.975) 4(-2.825,0.325) 5(-2.825,-0.325) 6(-2.825,-0.975) 7(-2.825,-1.625) 8(-2.825,-2.275) 9(2.825,-2.275) 10(2.825,-1.625) 11(2.825,-0.975) 12(2.825,-0.325) 13(2.825,0.325) 14(2.825,0.975) 15(2.825,1.625) 16(2.825,2.275)
  silkscreen extent -4.63,-2.5 1.5,2.5, body extent -3.9,-2.75 3.9,2.75, height 0.25
FP-RMCF0603-IPC_B [mil]
  rect 39.61x37.73 smd paste+0 mask+0: 1(-27.6,0) 2(27.6,0)
  silkscreen extent -47,-35 47,35, body extent -57,-29 57,29, height 10
FP-RMCF2512-IPC_C [mil]
  rect 51.35x132.09 smd paste+0 mask+0: 1(-108.31,0) 2(108.31,0)
  silkscreen extent -71,-68 71,68, body extent -138,-72 138,72, height 10
FP-SMA-J-P-H-ST-EM1-MFG [mm]
  rect 1.27x3.6 smd paste+0 mask+0: 1(0,6.66)
  rect 1.35x4.2 smd paste+0 mask+0: 2(-2.825,6.86) 3(2.825,6.86)
  rect 1.35x4.2 smd far side paste+0 mask+0: 4(-2.825,6.86) 5(2.825,6.86)
  silkscreen extent -3.9,5.5 3.9,9.48, body extent -3.6,-4.92 3.6,9.06, height 0.25
LT-DE-UE-12_V [mm] "SON, 12-Leads, Body 4x3mm, Pitch 0.5mm, Thermal Pad 3.3x1.7mm"
  rect 0.7x0.25 smd: 1(-1.45,1.25) 2(-1.45,0.75) 3(-1.45,0.25) 4(-1.45,-0.25) 5(-1.45,-0.75) 6(-1.45,-1.25) 7(1.45,-1.25) 8(1.45,-0.75) 9(1.45,-0.25) 10(1.45,0.25) 11(1.45,0.75) 12(1.45,1.25)
  rect 1.7x3.3 smd: 13(0,0)
  silkscreen extent -2,-2.05 1.55,2.1, body extent -1.5,-2 1.5,2, height 0.8
ONSC-SOT-23-3-318-08_V [mm] "SOT23, 3-Leads, Body 2.92x1.3mm, Pitch 0.95mm"
  rect 0.9x0.8 smd: 1(-1,0.95) 2(-1,-0.95) 3(1,0)
  silkscreen extent -1.12,-1.46 0.65,2.03, body extent -0.65,-1.46 0.65,1.46, height 1.11
QFN16_3x3x0p8_TGT [mil]
  rect 24x10 smd paste+0 mask+0: 1(-60,29.53) 2(-60,9.84) 3(-60,-9.84) 4(-60,-29.53) 9(60,-29.53) 10(60,-9.84) 11(60,9.84) 12(60,29.53)
  rect 10x24 smd paste+0 mask+0: 5(-29.53,-60) 6(-9.84,-60) 7(9.84,-60) 8(29.53,-60) 13(29.53,60) 14(9.84,60) 15(-9.84,60) 16(-29.53,60)
  rect 69x69 smd paste+0 mask+0: 17(0,0)
  silkscreen extent -65,-65 92,65, body extent -60,-60 60,60, height 35
QFN51P300X300X89-13N [mm]
  rect 0.85x0.3 smd: 1(-1.45,0.51) 2(-1.45,0) 3(-1.45,-0.51) 7(1.45,-0.51) 8(1.45,0) 9(1.45,0.51)
  rect 0.3x0.85 smd: 4(-0.51,-1.45) 5(0,-1.45) 6(0.51,-1.45) 10(0.51,1.45) 11(0,1.45) 12(-0.51,1.45)
  rect 1.45x1.45 smd: 13(0,0)
  silkscreen extent -2,1.15 -1.75,1.4, body extent -1.5,-1.5 1.5,1.5, height 0.89
RESC1608X55X25LL10T15 [mm] "Chip Resistor, 2-Leads, Body 1.60x0.80mm, IPC High Density"
  rect 0.6x0.8 smd: 1(-0.65,0) 2(0.65,0)
  body extent -0.85,-0.45 0.85,0.45, height 0.55
RESC1608X55X30LL15T15 [mm] "Chip Resistor, 2-Leads, Body 1.60x0.80mm, IPC High Density"
  rect 0.7x0.85 smd: 1(-0.625,0) 2(0.625,0)
  body extent -0.87,-0.48 0.87,0.48, height 0.55
RESC1608X55X30ML20T10 [mm] "Chip Resistor, 2-Leads, Body 1.60x0.80mm, IPC Low Density"
  rect 0.9x1.1 smd: 1(-0.75,0) 2(0.75,0)
  body extent -0.9,-0.5 0.9,0.5, height 0.55
RESC3216X70X40NL20T20 [mm] "Chip Resistor, 2-Leads, Body 3.20x1.60mm, IPC Medium Density"
  rect 1.15x1.8 smd: 1(-1.475,0) 2(1.475,0)
  silkscreen extent -0.5,-0.8 0.5,0.8, body extent -1.7,-0.9 1.7,0.9, height 0.7
SOT65P210X110-6N [mm]
  rect 0.95x0.4 smd: 1(-1,0.65) 2(-1,0) 3(-1,-0.65) 4(1,-0.65) 5(1,0) 6(1,0.65)
  silkscreen extent -1.47,-1 0.18,1.2
TI-DCK6_V [mm] "SOT23, 6-Leads, Body 2x1.25mm, Pitch 0.65mm"
  rect 0.9x0.4 smd: 1(-1.1,0.65) 2(-1.1,0) 3(-1.1,-0.65) 4(1.1,-0.65) 5(1.1,0) 6(1.1,0.65)
  silkscreen extent -1.23,-1 0.25,1.52, body extent -0.63,-1 0.63,1, height 1.1
VSSOP28_DGS_TEX [mil]
  rect 53.5x11 smd paste+0 mask+0: 1(-87.75,127.99) 2(-87.75,108.3) 3(-87.75,88.61) 4(-87.75,68.92) 5(-87.75,49.23) 6(-87.75,29.54) 7(-87.75,9.85) 8(-87.75,-9.84) 9(-87.75,-29.53) 10(-87.75,-49.22) 11(-87.75,-68.91) 12(-87.75,-88.6) 13(-87.75,-108.29) 14(-87.75,-127.98) 15(87.75,-127.98) 16(87.75,-108.29) 17(87.75,-88.6) 18(87.75,-68.91) 19(87.75,-49.22) 20(87.75,-29.53) 21(87.75,-9.84) 22(87.75,9.85) 23(87.75,29.54) 24(87.75,49.23) 25(87.75,68.92) 26(87.75,88.61) 27(87.75,108.3) 28(87.75,127.99)
  silkscreen extent -134,-146 134,146, body extent -101,-141 101,141, height 43
WE-SPXO_CFPS-39 [mm] "Simple Packaged Quartz Oscillator, body 3.2x2.5mm"
  rect 1.4x1 smd: 1(-1.1,-0.8) 2(1.1,-0.8) 3(1.1,0.8) 4(-1.1,0.8)
  silkscreen extent -2.42,-1.12 -2.17,-0.88, body extent -1.6,-1.25 1.6,1.25, height 1.05
WL-SMCW_1206_150120xx75000 [mm] "SMD Mono-color Chip LED, body 3.2x1.6mm"
  rect 1.4x1.6 smd: 1(-1.5,0) 2(1.5,0)
  silkscreen extent -2.6,-0.75 -2.4,0.75, body extent -1.6,-0.8 1.6,0.8, height 0.68

## Part data
C1 C3 C6 C17 C20: library part CMP-2000-04979-3, "Multilayer Ceramic Capacitors 10μF ±10% 10V X5R SMD 0603", Capacitance=10uF, Case Code (Imperial)=0603, Case Code (Metric)=1608, Dielectric=X5R, Dielectric Material=Ceramic, Max Operating Temperature=85°C, Min Operating Temperature=-55°C, Package Quantity=1, Tolerance=10%, Voltage=10V, Case/Package=0603, Construction=Flat, Depth=0.8mm, Height=0.8mm, Lead Free="Lead Free", Length=1.6mm, Mount="Surface Mount", Number of Pins=2, Packaging="Tape and Reel", Radiation Hardening=No, REACH SVHC="No SVHC", Resistor Type=Ceramic, RoHS Compliant=Yes, Series=C, Termination=SMD/SMT, Thickness=0.035inch, Voltage Rating=10V, Voltage Rating (DC)=10V, Weight=7.1E-05oz, Width=0.8mm
C2 C5 C13 C14 C15 C18 C23 C24 C25: library part CMP-2006-01211-1, Manufacturer=Vitramon, Part Number=VJ0603Y104KXJAP
C4: library part CMP-03422-001497-1, "CAP CER 22UF 25V X5R 0805", Capacitance=22uF, Case Code (Imperial)=0805, Case Code (Metric)=2012, Dielectric=X5R, Max Operating Temperature=85°C, Min Operating Temperature=-55°C, Package Quantity=3000, Tolerance=20%, Voltage Rating=25V, Case/Package=0805, Halogen Free="Halogen Free", Height=1.25mm, Lead Free="Lead Free", Length=0.079inch, Mount="Surface Mount", Packaging="Tape and Reel", RoHS Compliant=Yes, Termination=SMD/SMT, Thickness=0.057inch, Voltage Rating (DC)=25V, Weight=0.000194oz, Width=0.049inch
C7 C19: library part CMP-2000-06025-2, "Multilayer Ceramic Capacitors 1μF ±10% 50V X5R SMD 0603", Capacitance=1uF, Case Code (Imperial)=0603, Case Code (Metric)=1608, Dielectric=X5R, Dielectric Material=Ceramic, Max Operating Temperature=85°C, Min Operating Temperature=-55°C, Package Quantity=1, Tolerance=10%, Voltage=50V, Case/Package=0603, Construction=Flat, Depth=0.8mm, Height=0.8mm, Lead Free="Lead Free", Length=1.6mm, Mount="Surface Mount", Number of Pins=2, Packaging="Tape and Reel", Radiation Hardening=No, REACH SVHC="No SVHC", Resistor Type=Ceramic, RoHS Compliant=Yes, Series=C, Termination=SMD/SMT, Thickness=0.035inch, Voltage Rating=50V, Voltage Rating (DC)=50V, Weight=7.1E-05oz, Width=0.031inch
C8: library part CMP-2006-03564-1, Manufacturer=Kemet, Part Number=C0603C331J5GALTU
C9: library part CMP-2006-02012-1, Manufacturer=Vitramon, Part Number=VJ0603A100KXAAC